# Altium PCB TCM_initial _Design.PcbDoc
Units mm, origin at the board's own origin, x right, y up, seen from the top; angles counter-clockwise.
Board outline 120.12 x 48.06 mm, 2 copper layers (Top Layer, Bottom Layer), stack 1.448 mm thick; 52 components, 52 nets, 170 pads, 43 vias.
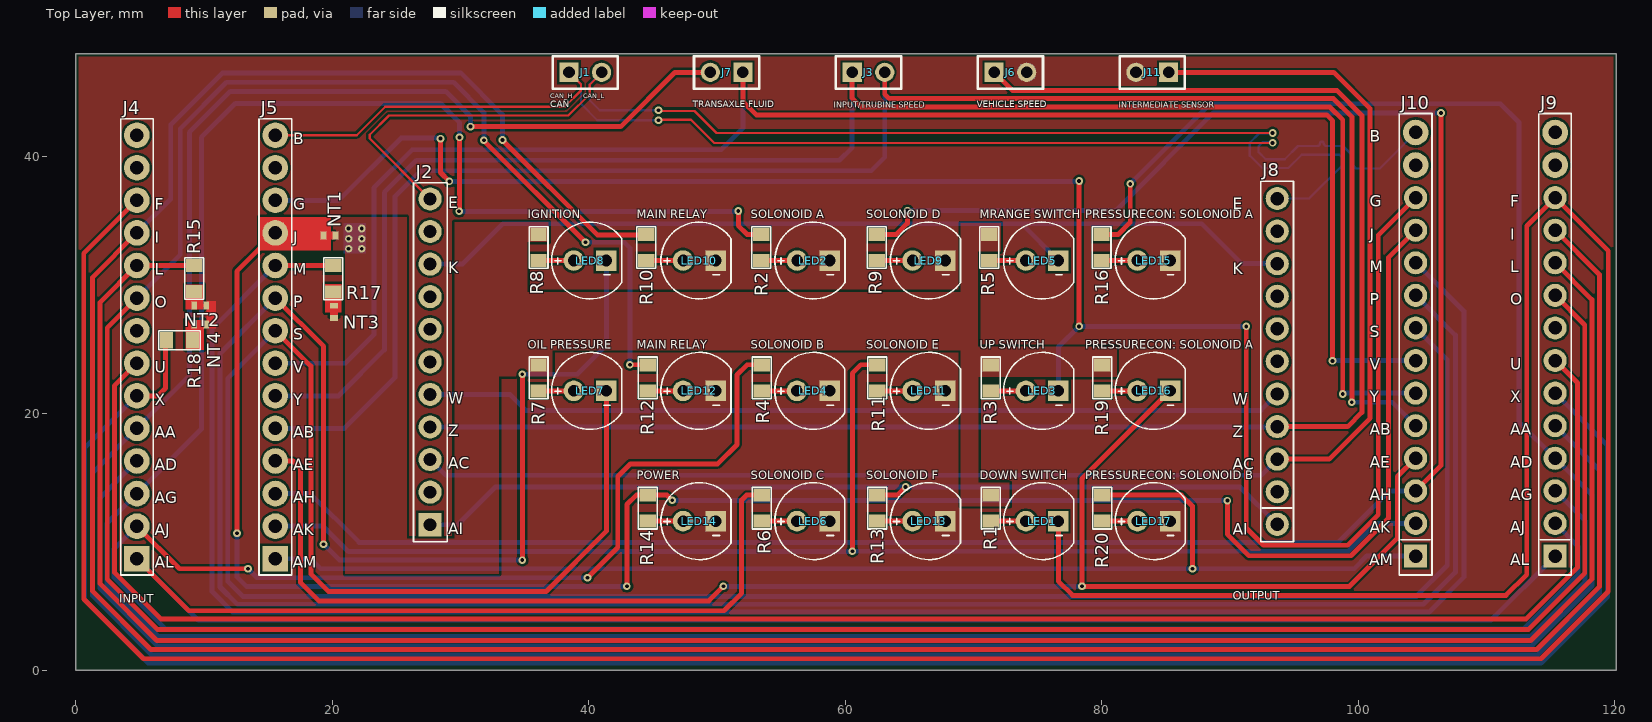
[diagram p0: Top Layer view]
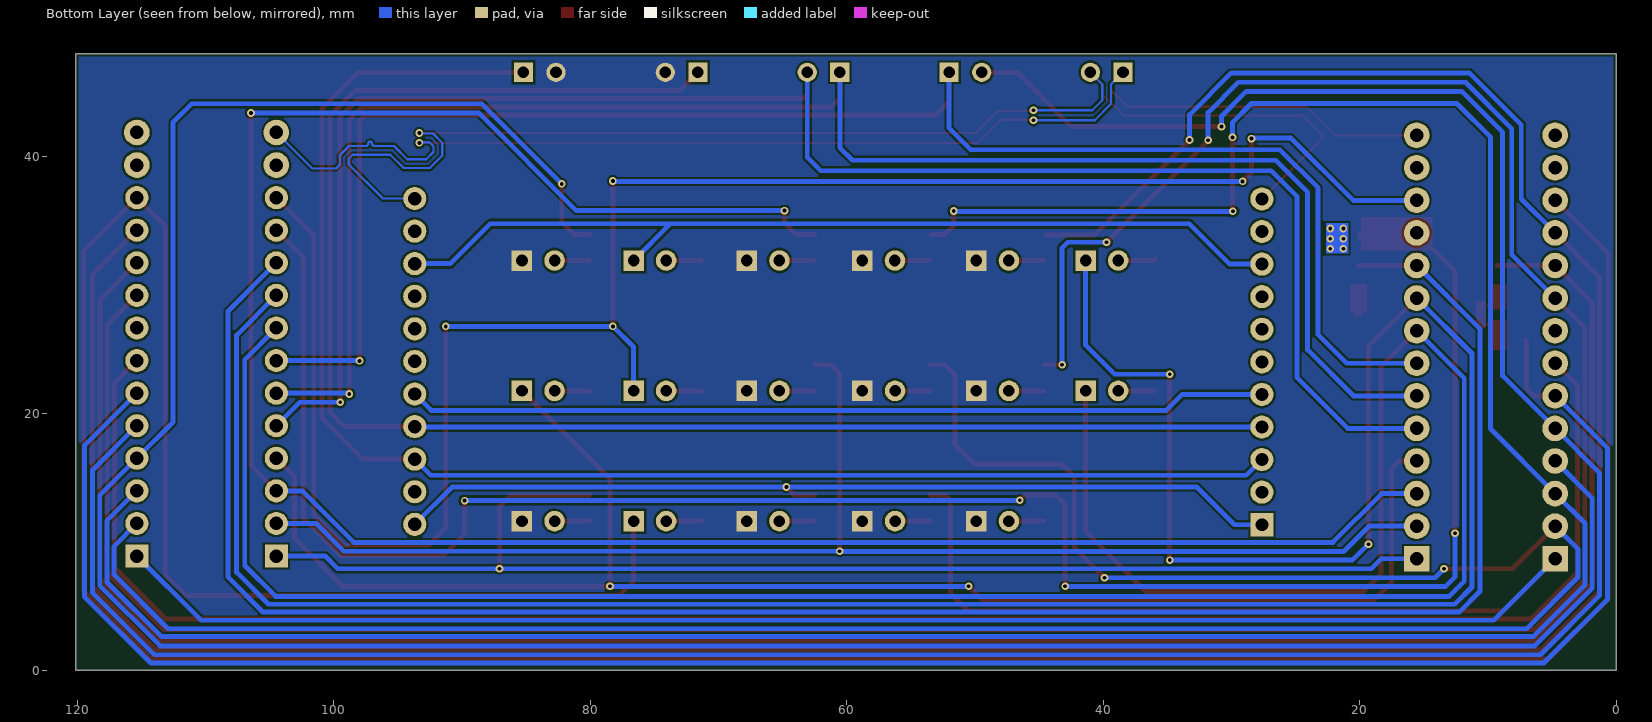
[diagram p1: Bottom Layer view, seen from below]
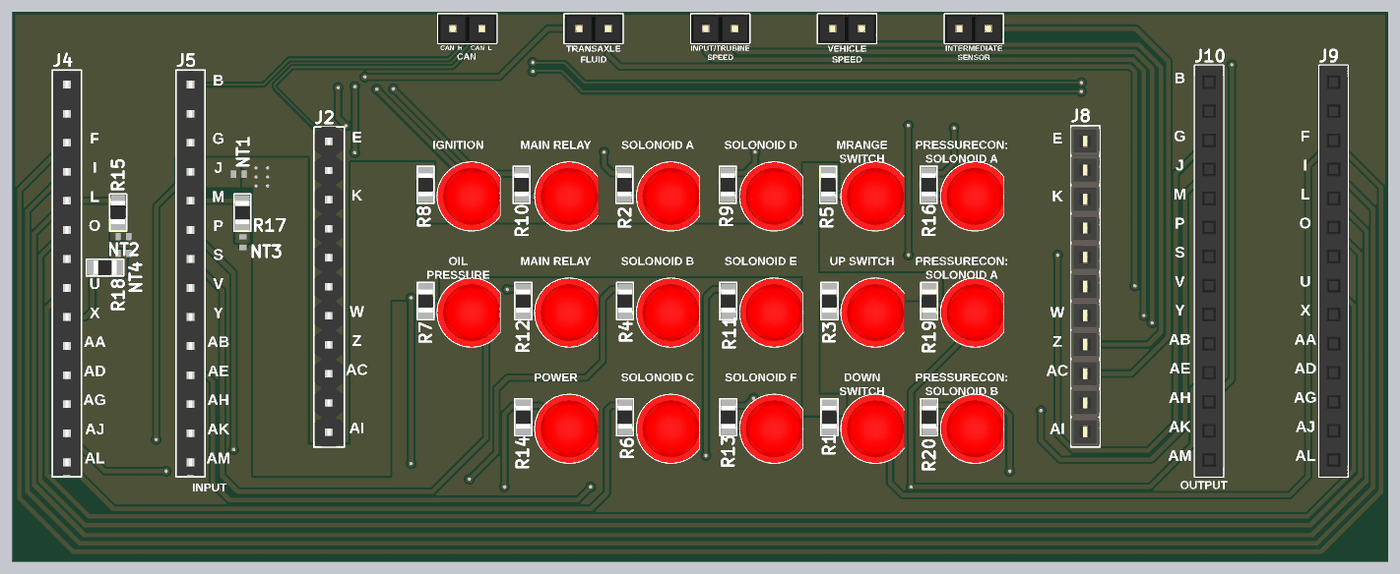
[diagram p2: 3D render of the assembled board from above, using the file's embedded part models]

## Layer stack, top to bottom
Top Solder: solder mask 0.0762, Solder Resist, Dk 3.5
Top Layer: signal copper 0.254
Dielectric 1: dielectric 0.9398, FR-4, Dk 4.8
Bottom Layer: signal copper 0.254
Bottom Solder: solder mask 0.0762, Solder Resist, Dk 3.5

## Board outline
0,0 0,48.057 120.117,48.057 120.117,0

## Design rules (kind name [scope] priority, off if disabled: settings)
BoardOutlineClearance [All] p1: gap=0 ignorepadtopadclearanceinfootprint=FALSE except(0.254: Poly-OutlineEdge)
Clearance [All] p1: gap=0.178 ignorepadtopadclearanceinfootprint=FALSE except(0: Arc-Hole Track-Hole SMDPad-Hole THPad-Hole Via-Hole Fill-Hole Poly-Hole Region-Hole Text-Hole; 0.102: Arc-SMDPad Track-SMDPad SMDPad-SMDPad)
DiffPairsRouting [InDifferentialPair('CAN')] p1: maxlimit=0.508 minlimit=0.508 mostfreqgap=0.508 toplayer_minwidth=0.178 toplayer_maxwidth=0.178 toplayer_prefwidth=0.178 bottomlayer_minwidth=0.178 bottomlayer_maxwidth=0.178 bottomlayer_prefwidth=0.178 impedanceprofiledriven=TRUE impedanceprofileid={E7D87EF9-33C4-4B85-B4AA-187234593E4B} impedanceprofilevalue=120.000000 maxuncoupledlength=12.7
HoleToHoleClearance [All] p1: gap=0 allowstackedmicrovias=TRUE
MaxMinImpedance "Schematic Impedance Constraint_1" [InDifferentialPairClass('CAN')] p1: minimum=117.0 maximum=123.0
MinimumSolderMaskSliver [All] p1: minsoldermaskwidth=0
PolygonConnect [All] p1: connectstyle=Direct reliefconductorwidth=0.254 reliefentries=4 polygonreliefangle="90 Angle" airgapwidth=0.254
RoutingVias [All] p1: holewidth=0.3 width=0.6 viastyle="Through Hole" minholewidth=0.3 minwidth=0.6 maxholewidth=0.3 maxwidth=0.6
SilkToSilkClearance [All] p1: silktosilkclearance=0
SilkToSolderMaskClearance [IsPad] p1: minsilkscreentomaskgap=0 clearancetoexposedcopper=TRUE
SolderMaskExpansion [All] p1: expansion=0.102 istentingtop=FALSE
Width [All] p1: maxlimit=1.016 minlimit=0.381 preferedwidth=0.559
25 further rules are at their usual default settings.

## Classes and differential pairs
differential pair class CAN: CAN
differential pair CAN: +CAN_P -CAN_N

## Components (designator, comment, footprint, x,y, rotation, side; value= is the part's Value field where it differs from the comment)
J1 "X6511WV-02H-C60D30" HDR1X2_ 38.464,46.598 r0 top locked
J2 "X6511WV-11H-C60D30" "HDR 1X11 male" 27.635,24.028 r90 top locked
J3 "X6511WV-02H-C60D30" HDR1X2_ 60.54,46.598 r0 top locked
J4 "X6511WV-14H-C60D30" "HDR 1x14 TH Male" 4.775,25.19 r90 top locked
J5 "X6511WV-14H-C60D30" "HDR 1x14 TH Male" 15.57,25.19 r90 top locked
J6 "X6511WV-02H-C60D30" HDR1X2_ 71.604,46.598 r0 top locked
J7 "X6511WV-02H-C60D30" HDR1X2_ 52.019,46.598 r180 top locked
J8 "X6511FV-11-C85D32" "HDR 1x11 TH (Female)" 93.675,24.061 r90 top locked
J9 "X6511FV-14-C85D32" "HDR 1x14 TH (Female)" 115.341,25.4 r90 top locked
J10 "X6511FV-14-C85D32" "HDR 1x14 TH (Female)" 104.47,25.4 r90 top locked
J11 "X6511WV-02H-C60D30" HDR1X2_ 85.208,46.598 r180 top locked
LED1 "NFD5408UGD" "TH LED 5mm Green" 75.349,11.608 r180 top locked
LED2 "NFD5408WC" "TH LED 5mm White" 57.51,31.928 r180 top locked
LED3 "NFD5408UGD" "TH LED 5mm Green" 75.349,21.768 r180 top locked
LED4 "NFD5408WC" "TH LED 5mm White" 57.506,21.768 r180 top locked
LED5 "NFD5408UGD" "TH LED 5mm Green" 75.349,31.928 r180 top locked
LED6 "NFD5408WC" "TH LED 5mm White" 57.506,11.608 r180 top locked
LED7 "NFD5408UYD" "TH LED 5mm Yellow" 40.107,21.768 r180 top locked
LED8 "NFD5408UYD" "TH LED 5mm Yellow" 40.107,31.928 r180 top locked
LED9 "NFD5408WC" "TH LED 5mm White" 66.516,31.928 r180 top locked
LED10 "NFD5408URD" "TH LED 5mm_" 48.624,31.928 r180 top locked
LED11 "NFD5408WC" "TH LED 5mm White" 66.516,21.768 r180 top locked
LED12 "NFD5408URD" "TH LED 5mm_" 48.624,21.768 r180 top locked
LED13 "NFD5408WC" "TH LED 5mm White" 66.516,11.608 r180 top locked
LED14 "NFD5408URD" "TH LED 5mm_" 48.624,11.608 r180 top locked
LED15 "NFD5408BC" "TH LED 5mm Blue" 84.049,31.928 r180 top locked
LED16 "NFD5408BC" "TH LED 5mm Blue" 84.049,21.768 r180 top locked
LED17 "NFD5408BC" "TH LED 5mm Blue" 84.049,11.608 r180 top locked
NT1 "Net Tie_SMD" "Net Tie Pad" 19.787,33.884 r180 top locked net-tie
NT2 "Net Tie_SMD" "Net Tie Pad" 9.716,28.423 r0 top locked net-tie
NT3 "Net Tie_SMD" "Net Tie Pad" 20.142,27.927 r270 top locked net-tie
NT4 "Net Tie_SMD" "Net Tie Pad" 9.716,26.949 r0 top locked net-tie
R1 "1K" RES-0805 71.336,12.624 r270 top locked value=1kR
R2 "1K" RES-0805 53.442,32.944 r270 top locked value=1kR
R3 "1K" RES-0805 71.336,22.784 r270 top locked value=1kR
R4 "1K" RES-0805 53.492,22.784 r270 top locked value=1kR
R5 "1K" RES-0805 71.222,32.944 r270 top locked value=1kR
R6 "1K" RES-0805 53.492,12.624 r270 top locked value=1kR
R7 "1K" RES-0805 36.093,22.784 r270 top locked value=1kR
R8 "1K" RES-0805 36.093,32.944 r270 top locked value=1kR
R9 "1K" RES-0805 62.459,32.944 r270 top locked value=1kR
R10 "1K" RES-0805 44.475,32.944 r270 top locked value=1kR
R11 "1K" RES-0805 62.503,22.784 r270 top locked value=1kR
R12 "1K" RES-0805 44.611,22.784 r270 top locked value=1kR
R13 "1K" RES-0805 62.503,12.624 r270 top locked value=1kR
R14 "1K" RES-0805 44.611,12.624 r270 top locked value=1kR
R15 "0R" Res-0805 9.252,30.524 r270 top locked
R16 "1K" RES-0805 79.985,32.944 r270 top locked value=1kR
R17 "0R" Res-0805 20.091,30.505 r270 top locked
R18 "0R" Res-0805 8.103,25.705 r0 top locked
R19 "1K" RES-0805 80.035,22.784 r270 top locked value=1kR
R20 "1K" RES-0805 80.035,12.624 r270 top locked value=1kR

## Footprints (in the part's own frame and the unit in brackets; to place one, negate y for a bottom-side part, rotate by r counter-clockwise, add the part's x,y. Pads: shape width x height; smd on the part's side, far side on the other; paste and mask are expansions set on the pad)
HDR1X2_ [mm] "CONN HEADER VERT 2POS 2.54MM"
  rect 1.5x1.5 hole 0.9: 1(0,0)
  round 1.5 hole 0.9: 2(2.54,0)
  silkscreen extent -1.27,-1.27 3.81,1.27, body extent -1.27,-1.27 3.81,1.27, height 8.44
"HDR 1X11 male" [mm]
  rect 1.8x1.8 hole 1: 1(-12.7,0)
  round 1.8 hole 1: 2(-10.16,0) 3(-7.62,0) 4(-5.08,0) 5(-2.54,0) 6(0,0) 7(2.54,0) 8(5.08,0) 9(7.62,0) 10(10.16,0) 11(12.7,0)
  silkscreen extent -14.02,-1.35 13.97,1.3, body extent -13.98,-1.25 13.97,1.25, height 8.5
"HDR 1x11 TH (Female)" [mm]
  round 1.8 hole 1.05 paste+0 mask+0.051: 1(-12.7,0) 2(-10.16,0) 3(-7.62,0) 4(-5.08,0) 5(-2.54,0) 6(0,0) 7(2.54,0) 8(5.08,0) 9(7.62,0) 10(10.16,0) 11(12.7,0)
  silkscreen extent -14.05,-1.27 14.05,1.27, body extent -13.97,-1.24 13.98,1.3, height 8.5
"HDR 1x14 TH (Female)" [mm]
  rect 1.8x1.8 hole 1.05 paste+0 mask+0.051: 1(-16.51,0)
  round 1.8 hole 1.05 paste+0 mask+0.051: 2(-13.97,0) 3(-11.43,0) 4(-8.89,0) 5(-6.35,0) 6(-3.81,0) 7(-1.27,0) 8(1.27,0) 9(3.81,0) 10(6.35,0) 11(8.89,0) 12(11.43,0)
  round 2 hole 1.05 paste+0 mask+0.051: 13(13.97,0) 14(16.51,0)
  silkscreen extent -17.99,-1.27 17.99,1.27, body extent -17.99,-1.25 17.98,1.25, height 8.8
"HDR 1x14 TH Male" [mm]
  rect 2x2 hole 1.05 paste+0 mask+0.051: 1(-16.51,0)
  round 2 hole 1.05 paste+0 mask+0.051: 2(-13.97,0) 3(-11.43,0) 4(-8.89,0) 5(-6.35,0) 6(-3.81,0) 7(-1.27,0) 8(1.27,0) 9(3.81,0) 10(6.35,0) 11(8.89,0) 12(11.43,0) 13(13.97,0) 14(16.51,0)
  silkscreen extent -17.78,-1.27 17.78,1.27, body extent -17.66,-1.18 17.65,1.18, height 10.72
"Net Tie Pad" [mil]
  rect 18x25 smd mask-10: 1(-18.5,0) 2(18.5,0)
  Top Layer region: -15,-12 15,-12 15,12 -15,12
RES-0805 [mil] "SMD 0805"
  rect 40x50 smd: 1(-40,0) 2(40,0)
  silkscreen extent -64,-29 64,29, body extent -39,-25 39,24, height 24
Res-0805 [mil] "SMD 0805"
  rect 40x50 smd: 1(-40,0) 2(40,0)
  silkscreen extent -64,-29 64,29, body extent -39,-25 39,24, height 24
"TH LED 5mm Blue" [mm]
  rect 1.6x1.6 hole 0.9: 1(-1.27,0)
  round 1.6 hole 0.9: 2(1.27,0)
  silkscreen extent -2.47,-3 3,3, body extent -2.5,-3 3,3, height 9.44
"TH LED 5mm Green" [mm]
  rect 1.6x1.6 hole 0.9: 1(-1.27,0)
  round 1.6 hole 0.9: 2(1.27,0)
  silkscreen extent -2.47,-3 3,3, body extent -2.5,-3 3,3, height 9.44
"TH LED 5mm White" [mm]
  rect 1.6x1.6 hole 0.9: 1(-1.27,0)
  round 1.6 hole 0.9: 2(1.27,0)
  silkscreen extent -2.47,-3 3,3, body extent -2.5,-3 3,3, height 9.44
"TH LED 5mm Yellow" [mm]
  rect 1.6x1.6 hole 0.9: 1(-1.27,0)
  round 1.6 hole 0.9: 2(1.27,0)
  silkscreen extent -2.47,-3 3,3, body extent -2.5,-3 3,3, height 9.44
"TH LED 5mm_" [mm]
  rect 1.6x1.6 hole 0.9: 1(-1.27,0)
  round 1.6 hole 0.9: 2(1.27,0)
  silkscreen extent -2.47,-3 3,3, body extent -2.5,-3 3,3, height 9.44

## Part data
J1 J3 J6 J7 J11: "Gold 250V 3A Straight Square Pins 2.5mm 2P 260℃ 6mm -40℃~+105℃ 3mm 2.54mm Plugin Black Brass 1x2P Plugin,P=2.54mm Pin Headers ROHS", LCSC Part Number=C706874, Manufacturer=XKB, Package=Plugin,P=2.54mm, ComponentLink1Description=LCSC, ComponentLink1URL=https://www.lcsc.com/product-detail/Pin-Headers_XKB-Connectivity-X6511WV-02H-C60D30_C706874.html, Item Type="Male Header", Manufacturer Part Number=X6511WV-02H-C60D30
J2: "Gold 250V 3A Policy 2.5mm 11P 260℃ -40℃~+105℃ 2.54mm Single Row Black Brass 1x11P 2.54mm Plugin,P=2.54mm Pin Headers ROHS", LCSC Part Number=C725943, Manufacturer=XKB, Package=Plugin,P=2.54mm, ComponentLink1Description=LCSC, ComponentLink1URL=https://www.lcsc.com/product-detail/Pin-Headers_XKB-Connection-X6511WV-11H-C60D30_C725943.html, Item Type="Male Header", Manufacturer Part Number=X6511WV-11H-C60D30
J4 J5: "Gold 250V 3A Policy 2.5mm 14P 260℃ -40℃~+105℃ 2.54mm Single Row Black Brass 2.54mm 1x14P Plugin,P=2.54mm Pin Headers ROHS", LCSC Part Number=C725946, Manufacturer=XKB, Package=Plugin,P=2.54mm, ComponentLink1Description=LCSC, ComponentLink1URL=https://www.lcsc.com/product-detail/Pin-Headers_XKB-Connection-X6511WV-14H-C60D30_C725946.html, Item Type="Male Header", Manufacturer Part Number=X6511WV-14H-C60D30
J8: "2.54mm Single Row Gold 3A 11P Brass -40℃~+105℃ 250V 260℃ Direct Insert 1x11P 8.5mm Top Square Hole Plugin,P=2.54mm Female Headers ROHS", LCSC Part Number=C2883728, Manufacturer="XKB Connectivity", ComponentLink1Description=LCSC, ComponentLink1URL=https://www.lcsc.com/product-detail/Female-Headers_XKB-Connection-X6511FV-11-C85D32_C2883728.html, Item Type="Female Header", Manufacturer Part Number=X6511FV-11-C85D32, RoHS=No, Supplier=LCSC
J9 J10: "2.54mm Single Row Gold 3A 14P Brass -40℃~+105℃ 250V 260℃ Direct Insert 1x14P 8.5mm Top Square Hole Plugin,P=2.54mm Female Headers ROHS", LCSC Part Number=C2883731, Manufacturer="XKB Connectivity", Item Type=Header, Manufacturer Part Number=X6511FV-14-C85D32
LED1 LED3 LED5: "515nm~525nm -30℃~+85℃ Emerald 30° 200mW Plugin,D=5mm LED Indication - Discrete ROHS", LCSC Part Number=C20618157, Manufacturer=Foshan, Package=Plugin,D=5mm, ComponentLink1Description=LCSC, ComponentLink1URL=https://www.lcsc.com/product-detail/LED-Indication-Discrete_Foshan-NationStar-Optoelectronics-NFD5408UGD_C20618157.html, Item Type=LED, Manufacturer Part Number=NFD5408UGD
LED2 LED4 LED6 LED9 LED11 LED13: "-30℃~+85℃ White 20° 200mW Plugin,D=5mm LED Indication - Discrete ROHS", LCSC Part Number=C20618159, Manufacturer=Foshan, Package=Plugin,D=5mm, ComponentLink1Description=LCSC, ComponentLink1URL=https://www.lcsc.com/product-detail/LED-Indication-Discrete_Foshan-NationStar-Optoelectronics-NFD5408WC_C20618159.html, Item Type=LED, Manufacturer Part Number=NFD5408WC
LED7 LED8: "585nm~595nm -30℃~+85℃ Yellow 30° 200mW Plugin,D=5mm LED Indication - Discrete ROHS", LCSC Part Number=C20618155, Manufacturer=Foshan, Package=Plugin,D=5mm, ComponentLink1Description=LCSC, ComponentLink1URL=https://www.lcsc.com/product-detail/LED-Indication-Discrete_Foshan-NationStar-Optoelectronics-NFD5408UYD_C20618155.html, Item Type=LED, Manufacturer Part Number=NFD5408UYD
LED10 LED12 LED14: "620nm~630nm -30℃~+85℃ Red 30° 200mW Plugin,D=5mm LED Indication - Discrete ROHS", LCSC Part Number=C20618154, Manufacturer=Foshan, Package=Plugin,D=5mm, ComponentLink1Description=LCSC, ComponentLink1URL=https://www.lcsc.com/product-detail/LED-Indication-Discrete_Foshan-NationStar-Optoelectronics-NFD5408URD_C20618154.html, Item Type=LED, Manufacturer Part Number=NFD5408URD
LED15 LED16 LED17: "460nm~470nm -30℃~+85℃ Blue 20° 200mW Plugin,D=5mm LED Indication - Discrete ROHS", LCSC Part Number=C20618158, Manufacturer=Foshan, Package=Plugin,D=5mm, ComponentLink1Description=LCSC, ComponentLink1URL=https://www.lcsc.com/product-detail/LED-Indication-Discrete_Foshan-NationStar-Optoelectronics-NFD5408BC_C20618158.html, Item Type=LED, Manufacturer Part Number=NFD5408BC
NT1 NT2 NT3 NT4: "Net Tie SMD", Manufacturer Part Number="Net Tie", Item Type="Net Tie Pad"
R1 R2 R3 R4 R5 R6 R7 R8 R9 R10 R11 R12 R13 R14 R16 R19 R20: library part RC0805FR-071KL, "RES 1K OHM 1% 1/8W 0805", Case Code (Imperial)=0805, Case Code (Metric)=2012, LCSC Part Number=C95781, Manufacturer=Yageo, Max Operating Temperature=155°C, Max Power Dissipation=125mW, Min Operating Temperature=-55°C, Package Quantity=1, Resistance Tolerance=1%, Resistor Type="Thick Film", Supplier Part Number=8126013, Temperature Coefficient=100ppm/°C, Voltage Rating=150V, Case/Package=0805, Category="Chip SMD Resistors", ComponentLink1Description=https://datasheet.ciiva.com/7941/1686128-7941719.pdf?src-supplier=Element14, ComponentLink1URL=https://datasheet.ciiva.com/7941/1686128-7941719.pdf?src-supplier=Element14, ComponentLink2Description=https://datasheet.ciiva.com/46385/444164-46385020.pdf?src-supplier=Element14, ComponentLink2URL=https://datasheet.ciiva.com/46385/444164-46385020.pdf?src-supplier=Element14, ComponentLink3Description=https://datasheet.ciiva.com/2456/pyu-r-int-thick-7-2456976.pdf?src-supplier=Digi-Key, ComponentLink3URL=https://datasheet.ciiva.com/2456/pyu-r-int-thick-7-2456976.pdf?src-supplier=Digi-Key, ComponentLink4Description=https://datasheet.ciiva.com/2456/pyu-r-int-thick-7-2456977.pdf?src-supplier=Digi-Key, ComponentLink4URL=https://datasheet.ciiva.com/2456/pyu-r-int-thick-7-2456977.pdf?src-supplier=Digi-Key, ComponentLink5Description=https://datasheet.ciiva.com/2456/pyu-r-int-thick-7-2456975.pdf?src-supplier=Digi-Key, ComponentLink5URL=https://datasheet.ciiva.com/2456/pyu-r-int-thick-7-2456975.pdf?src-supplier=Digi-Key, ComponentLink6Description=https://datasheet.ciiva.com/16850/rc0805-16850409.pdf?src-supplier=Future+Electronics, ComponentLink6URL=https://datasheet.ciiva.com/16850/rc0805-16850409.pdf?src-supplier=Future+Electronics, Construction=Rectangular, Depth=1.25mm, Features="Moisture Resistant", Height=0.024inch, Item Type=Resistor, Lead Free=5697LeadFree, Length=0.079inch, Manufacturer Part Number=RC0805FR-071KL, Military Standard=Not, Number of Terminations=2, Packaging="Tape and Reel", Pins=2, Power Rating=125mW, Pricing="5000=0.117, 25000=0.112, 125000=0.107, 500000=0.104, 1250000=0.0981 (USD)", Reach SVHC Compliant=No, RoHS=Yes, RoHS Compliant=Yes, Series=RC, Stock=8305000, Supplier="Future Electronics", Termination=SMD/SMT, Tolerance=1%, Voltage Rating (AC)=150V, Voltage Rating (DC)=150V, Width=0.049inch
R15 R17 R18: library part RC0805FR-070RL, "RES 0 OHM JUMPER 1/8W 0805", Case Code (Imperial)=0805, Case Code (Metric)=2012, LCSC Part Number=C100045, Manufacturer=Yageo, Max Operating Temperature=155°C, Max Power Dissipation=125mW, Min Operating Temperature=-55°C, Resistance=0mR, Resistor Type="Thick Film", Tolerance=1%, Case/Package=0805, Category="Chip SMD Resistors", ComponentLink1Description=https://datasheet.ciiva.com/15189/getdatasheetpartid-348154-15189885.pdf?src-supplier=Verical, ComponentLink1URL=https://datasheet.ciiva.com/15189/getdatasheetpartid-348154-15189885.pdf?src-supplier=Verical, ComponentLink2Description=https://datasheet.ciiva.com/17042/rc0805-17042698.pdf?src-supplier=Future+Electronics, ComponentLink2URL=https://datasheet.ciiva.com/17042/rc0805-17042698.pdf?src-supplier=Future+Electronics, Construction=Rectangular, Contact Plating=Tin,Matte, Depth=1.25mm, Features="Moisture Resistant", Item Type=Resistor, Lead Free="Lead Free", Length=2mm, Manufacturer Part Number=RC0805FR-070RL, Military Standard=Not, Number of Terminations=2, Packaging="Tape and Reel", Power Rating=125mW, Pricing 1="5000=0.00281, 10000=0.00277, 20000=0.00269 (USD)", Radiation Hardening=No, RoHS=Yes, RoHS Compliant=Yes, Series=RC, Size Code=0805, Stock 1=85000, Supplier 1=Avnet, Supplier Part Number 1=RC0805FR-070RL

## Via types
v1: diameter 0.6, hole 0.3, Top Layer to Bottom Layer, tented both sides, 43 vias

## Nets (pads, with @x,y where several pads share a name; then routed paths per layer and width w, separated by ;. In a path a pad name is that pad's centre, name@x,y a point inside that pad or via, vN(x,y) a via of type N, cw(c..) or ccw(c..) an arc to the next point about the centre after c; other vN are vias at no path point)
12V: NT1.1 R1.1 R3.1 R5.1 R7.1 R8.1 R19.1
  other v1: 21.285,32.842 22.301,32.842 21.285,33.63 22.301,33.63 21.285,34.417 22.301,34.417
AA: J4.5 J7.2 J9.5 | length 220.4
  Top Layer w0.381: v1(30.785,42.367) 42.494,42.367 46.725,46.598 J7.2
  Bottom Layer w0.381: v1(30.785,42.367) 30.785,43.18 28.854,45.11 12.057,45.11 8.865,41.918 8.865,22.929 J4.5 1.321,15.386 1.321,5.791 5.918,1.194 113.988,1.194 118.796,6.001 118.796,15.596 J9.5
AB: J3.2 J5.5 J10.5 | length 138
  Top Layer w0.381: J3.2 63.08,44.895 63.424,44.552 98.062,44.552 99.492,43.122 v1(99.492,20.879)
  Bottom Layer w0.381: J5.5 20.948,18.84 24.892,22.784 24.892,36.906 26.908,38.922 62.039,38.922 63.08,39.964 J3.2 ; v1(99.492,20.879) 102.641,20.879 J10.5
AC: J2.3 J8.3 J11.1 | length 116.6
  Top Layer w0.381: J11.1 98.08,46.598 100.914,43.764 100.914,19.634 97.721,16.441 J8.3
  Bottom Layer w0.381: J2.3 28.854,15.189 92.424,15.189 J8.3
AD: J4.4 J9.4 R16.1 | length 208.9
  Top Layer w0.381: R16.1 81.28,33.96 82.22,34.9 v1(82.22,37.905)
  Bottom Layer w0.381: J4.4 1.88,13.404 1.88,6.375 6.372,1.883 113.534,1.883 118.237,6.585 118.237,13.614 J9.4 112.522,19.329 112.522,42.697 111.074,44.145 88.46,44.145 v1(82.22,37.905)
AE: J5.4 J10.4 LED16.1 | length 124.1
  Top Layer w0.381: J5.4 16.949,16.3 17.526,15.723 17.526,6.833 18.96,5.398 49.366,5.398 v1(50.495,6.528) ; LED16.1 78.461,14.91 v1(78.461,6.528) 99.314,6.528 103.048,10.262 103.048,15.088 J10.4
  Bottom Layer w0.381: v1(50.495,6.528) v1(78.461,6.528)
AG: J4.3 J9.3 R2.1 | length 218.4
  Top Layer w0.381: v1(29.896,35.763) 29.921,35.789 v1(29.921,41.529) ; v1(51.664,35.789) 51.664,34.646 52.349,33.96 R2.1
  Bottom Layer w0.381: v1(29.896,35.763) 51.638,35.763 v1(51.664,35.789) ; v1(29.921,41.529) 29.921,42.697 28.448,44.171 12.446,44.171 9.804,41.529 9.804,18.789 J4.3 2.438,11.423 2.438,6.655 6.492,2.601 113.415,2.601 117.678,6.865 117.678,11.633 J9.3
AH: J5.3 J10.3 R9.1 | length 170.9
  Top Layer w0.381: R9.1 63.983,33.96 64.846,34.823 v1(64.846,35.814) ; J10.3 106.451,15.951 v1(106.451,43.434)
  Bottom Layer w0.381: J5.3 18.298,13.76 22.101,9.957 ; 22.149,9.957 41.46,9.957 70.002,9.957 98.425,9.957 102.438,13.97 J10.3 ; v1(64.846,35.814) 81.074,35.814 88.694,43.434 105.512,43.434 v1(106.451,43.434)
AI: J2.1 J8.1 R13.1 | length 70.9
  Top Layer w0.381: R13.1 64.071,13.64 v1(64.706,14.275)
  Bottom Layer w0.381: J2.1 29.769,11.328 32.715,14.275 60.3,14.275 90.761,14.275 J8.1
AJ: J4.2 J9.2 R4.1 | length 190.7
  Top Layer w0.381: J4.2 8.096,7.899 v1(13.437,7.899) ; v1(39.903,7.196) 42.266,9.558 42.266,15.088 43.256,16.078 50.063,16.078 51.562,17.577 51.562,23.012 52.349,23.8 R4.1
  Bottom Layer w0.381: J4.2 2.997,9.442 2.997,7.216 6.995,3.218 112.911,3.218 117.119,7.427 117.119,9.652 J9.2 ; v1(13.437,7.899) 14.14,7.196 39.844,7.196 v1(39.903,7.196)
AK: J5.2 J10.2 R11.1 | length 106.7
  Top Layer w0.381: v1(60.554,9.263) 60.554,23.139 61.214,23.8 R11.1
  Bottom Layer w0.381: J5.2 19.285,11.22 21.267,9.239 60.504,9.239 v1@60.554,9.289 ; v1(60.554,9.263) 87.006,9.263 99.211,9.263 101.378,11.43 J10.2
AL: J4.1 J9.1 R6.1 | length 173
  Top Layer w0.381: J4.1 8.832,4.623 50.546,4.623 51.918,5.994 51.918,13.259 52.299,13.64 R6.1
  Bottom Layer w0.381: J4.1 9.569,3.886 110.338,3.886 J9.1
AM: J5.1 J10.1 R20.1 | length 101.9
  Top Layer w0.381: R20.1 86.208,13.64 87.071,12.776 v1(87.071,7.899)
  Bottom Layer w0.381: J5.1 18.346,8.68 19.123,7.902 99.67,7.902 100.658,8.89 J10.1
CAN_N: J1.2 J2.11 J8.11 | length 102.4
  Top Layer w0.178: J2.11 22.922,41.442 22.922,41.728 24.425,43.232 38.41,43.232 40.077,44.898 40.077,45.624 41.004,46.551 J1.2 ; v1(45.441,43.637) 45.487,43.591 48.255,43.591 49.971,41.875 v1(93.32,41.875)
  Bottom Layer w0.178: J1.2 40.077,45.671 40.077,44.425 40.864,43.637 v1(45.441,43.637) ; v1(93.32,41.875) 93.274,41.829 92.249,41.829 91.535,41.115 91.535,40.105 92.506,39.134 94.539,39.134 95.581,40.175 98.511,40.175 98.824,39.863 98.824,39.421 96.164,36.761 J8.11
CAN_P: J1.1 J5.14 J10.14 | length 102.4
  Top Layer w0.178: J5.14 21.924,41.7 24.141,43.918 38.126,43.918 39.391,45.182 39.391,45.671 J1.1 ; v1(45.441,42.859) 45.487,42.905 47.971,42.905 49.779,41.097 v1(93.32,41.097)
  Bottom Layer w0.178: J1.1 39.391,45.671 39.391,44.141 40.672,42.859 v1(45.441,42.859) ; v1(93.32,41.097) 93.274,41.143 92.533,41.143 92.221,40.831 92.221,40.389 92.79,39.819 94.255,39.819 95.297,40.861 95.961,40.861 96.826,40.861 ccw(c96.826,41.039) 97.004,41.039 cw(c97.157,41.039) 97.309,41.039 ccw(c97.487,41.039) 97.487,40.861 97.88,40.861 98.795,40.861 99.51,40.147 99.51,39.421 99.822,39.108 101.668,39.108 J10.14
F: J4.12 J9.12 LED1.1 | length 260.8
  Top Layer w0.381: J4.12 0.635,32.48 0.635,5.537 5.292,0.88 114.24,0.88 119.482,6.121 119.482,32.69 J9.12 113.132,34.62 113.132,7.442 111.506,5.817 77.724,5.817 76.619,6.922 LED1.1
G: J5.12 J10.12 LED3.1 | length 151.2
  Top Layer w0.381: v1(28.448,41.427) 28.448,38.786 v1(29.134,38.1) ; v1(78.232,26.797) v1(78.232,38.125) ; v1(91.262,26.797) 91.262,11.074 92.608,9.728 99.162,9.728 101.549,12.116 101.549,33.909 J10.12
  Bottom Layer w0.381: J5.12 20.516,36.62 25.375,41.478 28.397,41.478 v1(28.448,41.427) ; v1(29.134,38.1) 78.207,38.1 v1(78.232,38.125) ; LED3.1 76.619,25.184 v1(78.232,26.797) v1(91.262,26.797)
GND: J6.2 J11.2 LED2.1 LED4.1 LED6.1 LED9.1 LED10.1 LED11.1 LED12.1 LED13.1 LED14.1 LED15.1 LED17.1 NT2.2 NT3.2 NT4.2
I: J4.11 J9.11 R10.1 | length 234.7
  Top Layer w0.381: J4.11 1.321,30.626 1.321,6.147 5.874,1.593 113.887,1.593 118.796,6.502 118.796,30.836 J9.11 ; v1(33.274,41.326) 40.691,33.909 44.425,33.909 R10.1
  Bottom Layer w0.381: J4.11 7.417,36.722 7.417,42.518 11.457,46.558 30.023,46.558 33.274,43.307 v1(33.274,41.326)
J: J5.11 J10.11 NT1.2 R14.1 | length 152.8
  Top Layer w0.381: v1(12.573,10.668) 12.573,31.083 J5.11 ; v1(42.977,6.528) 42.977,12.903 43.713,13.64 46.101,13.64 v1(46.507,13.233) ; v1(89.789,13.208) 89.789,10.592 91.465,8.915 99.426,8.915 102.362,11.851 102.362,32.182 J10.11
  Bottom Layer w0.381: v1(12.573,10.668) 12.573,7.264 13.31,6.528 v1(42.977,6.528) ; v1(46.507,13.233) 89.637,13.233 89.662,13.208 v1(89.789,13.208)
K: J2.9 J8.9 LED5.1 | length 72.7
  Bottom Layer w0.381: J2.9 30.15,31.648 33.299,34.798 73.749,34.798 ; LED5.1 73.749,34.798 ; J8.9 90.9,31.681 87.782,34.798 73.749,34.798
L: J4.10 J9.10 R15.1 | length 176.4
  Top Layer w0.381: R15.1 J4.10 1.905,28.67 1.905,6.731 6.329,2.307 113.432,2.307 118.212,7.087 118.212,28.88 J9.10
M: J5.10 J10.10 R17.1 | length 157.4
  Top Layer w0.381: J5.10 20.073,31.54 R17.1
  Bottom Layer w0.381: J5.10 10.643,26.612 10.643,6.121 12.243,4.521 105.512,4.521 108.229,7.239 108.229,27.991 J10.10
NetLED1_2: LED1.2 R1.2 | length 2.7
  Top Layer w0.381: R1.2 LED1.2
NetLED2_2: LED2.2 R2.2 | length 2.7
  Top Layer w0.381: R2.2@53.497,31.928 LED2.2
NetLED3_2: LED3.2 R3.2 | length 2.7
  Top Layer w0.381: R3.2 LED3.2
NetLED4_2: LED4.2 R4.2 | length 2.7
  Top Layer w0.381: R4.2 LED4.2
NetLED5_2: LED5.2 R5.2 | length 2.7
  Top Layer w0.381: R5.2@71.336,31.928 LED5.2
NetLED6_2: LED6.2 R6.2 | length 2.7
  Top Layer w0.381: R6.2 LED6.2
NetLED7_2: LED7.2 R7.2 | length 2.7
  Top Layer w0.381: R7.2 LED7.2
NetLED8_2: LED8.2 R8.2 | length 2.9
  Top Layer w0.381: R8.2@35.966,32.055 R8.2 LED8.2
NetLED9_2: LED9.2 R9.2 | length 2.7
  Top Layer w0.381: R9.2@62.503,31.928 LED9.2
NetLED10_2: LED10.2 R10.2 | length 2.7
  Top Layer w0.381: R10.2@44.611,31.928 LED10.2
NetLED11_2: LED11.2 R11.2 | length 2.7
  Top Layer w0.381: R11.2 LED11.2
NetLED12_2: LED12.2 R12.2 | length 2.7
  Top Layer w0.381: R12.2 LED12.2
NetLED13_2: LED13.2 R13.2 | length 2.7
  Top Layer w0.381: R13.2 LED13.2
NetLED14_2: LED14.2 R14.2 | length 2.7
  Top Layer w0.381: R14.2 LED14.2
NetLED15_2: LED15.2 R16.2 | length 2.7
  Top Layer w0.381: R16.2@80.035,31.928 LED15.2
NetLED16_2: LED16.2 R19.2 | length 2.7
  Top Layer w0.381: R19.2 LED16.2
NetLED17_2: LED17.2 R20.2 | length 2.7
  Top Layer w0.381: R20.2 LED17.2
NetNT2_1: NT2.1 R15.2
NetNT3_1: NT3.1 R17.2
NetNT4_1: NT4.1 R18.2
O: J4.9 J9.9 R12.1 | length 232.4
  Top Layer w0.381: J4.9 2.464,26.689 2.464,7.087 6.375,3.175 113.284,3.175 117.653,7.544 117.653,26.899 J9.9 ; v1(31.826,41.3) 31.826,41.275 v1(39.751,33.35) ; v1(43.205,23.8) R12.1
  Bottom Layer w0.381: J4.9 8.153,32.378 8.153,42.213 11.762,45.822 29.464,45.822 31.826,43.459 v1(31.826,41.3) ; v1(39.751,33.35) 42.774,33.35 43.205,32.918 v1(43.205,23.8)
P: J5.9 J10.9 LED8.1 | length 210.5
  Top Layer w0.381: J5.9 19.329,25.241 v1(19.329,9.804) ; v1(34.823,8.57) v1(34.823,23.063)
  Bottom Layer w0.381: J5.9 11.252,24.682 11.252,6.477 12.598,5.131 105.08,5.131 107.569,7.62 107.569,26.111 J10.9 ; v1(19.329,9.804) 20.549,8.585 34.798,8.585 34.823,8.611 v1(34.823,8.57) ; v1(34.823,23.063) 39.116,23.063 41.377,25.324 LED8.1
S: J5.8 J10.8 LED7.1 | length 193.8
  Top Layer w0.381: J5.8 18.339,23.691 18.339,7.493 19.72,6.112 36.668,6.112 41.377,10.82 LED7.1
  Bottom Layer w0.381: J5.8 11.862,22.752 11.862,6.909 13.03,5.74 104.521,5.74 106.934,8.153 106.934,24.206 J10.8
U: J4.7 J9.7 | length 151.1
  Top Layer w0.381: J4.7 3.023,22.167 3.023,7.618 6.67,3.971 113.064,3.971 117.094,8.001 117.094,22.377 J9.7
V: J5.7 J7.1 J10.7 | length 129.2
  Top Layer w0.381: J7.1 52.019,44.323 53.061,43.282 97.536,43.282 97.993,42.824 v1(97.993,24.105)
  Bottom Layer w0.381: J5.7 21.024,23.92 23.251,26.146 23.251,37.586 26.228,40.564 50.343,40.564 52.019,42.24 J7.1 ; v1(97.993,24.105) 98.019,24.13 J10.7
W: J2.5 J8.5 | length 67.1
  Bottom Layer w0.381: J2.5 33.858,21.488 35.103,20.244 92.398,20.244 J8.5
X: J4.6 J9.6 R18.1 | length 164.3
  Top Layer w0.381: J4.6 6.419,21.38 7.01,21.971 7.01,25.629 R18.1
  Bottom Layer w0.381: J4.6 0.686,17.291 0.686,5.512 5.65,0.547 114.256,0.547 119.431,5.722 119.431,17.501 J9.6
Y: J3.1 J5.6 J10.6 | length 134.1
  Top Layer w0.381: J3.1 60.54,44.59 61.239,43.891 97.789,43.891 98.781,42.899 v1(98.781,21.514)
  Bottom Layer w0.381: J5.6 20.491,21.38 24.071,24.96 24.071,37.246 26.568,39.743 59.555,39.743 60.54,40.728 J3.1 ; v1(98.781,21.514) 98.857,21.59 J10.6
Z: J2.4 J6.1 J8.4 | length 126.3
  Top Layer w0.381: J6.1 73.015,45.187 98.325,45.187 100.279,43.232 100.279,20.091 99.168,18.981 J8.4
  Bottom Layer w0.381: J2.4 93.643,18.948 J8.4
pads on no net: J2.2 J2.6 J2.7 J2.8 J2.10 J4.8 J4.13 J4.14 J5.13 J8.2 J8.6 J8.7 J8.8 J8.10 J9.8 J9.13 J9.14 J10.13

## Polygon pours and split planes (outlines as drawn)
12V on Top Layer "12V_L01_P000" (solid, remove dead copper, pour order 0): 37.16,24.943 37.16,22.911 32.995,22.911 32.995,7.493 21.031,7.493 21.031,32.727 19.914,32.727 19.914,35.318 25.806,35.318 25.806,10.236 29.54,10.236 29.54,34.925 36.855,34.925 36.855,33.376 35.204,33.376 35.204,29.464 69.469,29.464 69.469,24.943
GND on Top Layer "GND_L01_P002" (solid, remove dead copper, pour order 2): 0,0 0,48.057 120.117,48.057 120.117,0
12V on Top Layer "12V_L01_P001" (solid, remove dead copper, pour order 1): 72.111,33.274 72.111,32.639 70.333,32.639 70.333,25.197 81.153,25.197 81.153,22.86 70.383,22.86 70.383,14.605 72.796,14.605 72.796,12.776 69.012,12.776 69.012,34.823 72.111,34.823
GND on Bottom Layer "GND_L02_P003" (solid, remove dead copper, pour order 3): 0,0 0,48.057 120.117,48.057 120.117,0

## Other copper
Top Layer:
  region net J: 19.914,35.318 14.326,35.318 14.326,32.727 19.914,32.727
  rectangle net NetNT4_1: 8.56,24.968 10.008,27.28
  rectangle net GND: 10.185,26.619 10.947,28.753
  rectangle net NetNT2_1: 8.56,28.092 9.982,30.048
  rectangle net NetNT3_1: 19.456,27.864 20.726,30.099
Bottom Layer:
  rectangle net 12V: 20.879,32.461 22.657,34.849

## Silkscreen, mask and mechanical layers (free items; w line width, h text height)
Top Overlay:
  text "CAN_H" at 37.008,44.434 h0.64
  text "CAN_L" at 39.569,44.434 h0.64
  text "CAN" at 37.008,43.678 h0.89
  text "TRANSAXLE FLUID" at 48.108,43.678 h0.89
  text "INTERMEDIATE SENSOR" at 81.305,43.678 h0.76
  text "INPUT/TRUBINE SPEED" at 59.106,43.673 h0.76
  text "VEHICLE SPEED" at 70.235,43.674 h0.89
  text "B" at 100.889,40.875 h1.52
  text "B" at 16.967,40.665 h1.52
  text "G" at 100.889,35.795 h1.52
  text "F" at 111.836,35.795 h1.52
  text "E" at 29.058,35.694 h1.52
  text "E" at 90.195,35.618 h1.52
  text "F" at 6.172,35.585 h1.52
  text "G" at 16.967,35.585 h1.52
  text "IGNITION" at 35.232,34.972 h1.14
  text "MAIN RELAY" at 43.749,34.972 h1.14
  text "SOLONOID A" at 52.635,34.972 h1.14
  text "SOLONOID D" at 61.641,34.972 h1.14
  text "MRANGE SWITCH" at 70.474,34.972 h1.14
  text "PRESSURECON: SOLONOID A" at 78.723,34.972 h1.14
  text "J" at 100.889,33.255 h1.52
  text "I" at 111.836,33.255 h1.52
  text "I" at 6.172,33.045 h1.52
  text "J" at 16.967,33.045 h1.52
  text "M" at 100.889,30.715 h1.52
  text "L" at 111.836,30.715 h1.52
  text "K" at 29.058,30.614 h1.52
  text "K" at 90.195,30.538 h1.52
  text "L" at 6.172,30.505 h1.52
  text "M" at 16.967,30.505 h1.52
  text "P" at 100.889,28.175 h1.52
  text "O" at 111.836,28.162 h1.52
  text "P" at 16.967,27.965 h1.52
  text "O" at 6.172,27.952 h1.52
  text "S" at 100.889,25.635 h1.52
  text "S" at 16.967,25.425 h1.52
  text "OIL PRESSURE" at 35.232,24.808 h1.14
  text "MAIN RELAY" at 43.749,24.812 h1.14
  text "SOLONOID B" at 52.631,24.812 h1.14
  text "SOLONOID E" at 61.641,24.812 h1.14
  text "UP SWITCH" at 70.474,24.812 h1.14
  text "PRESSURECON: SOLONOID A" at 78.723,24.812 h1.14
  text "V" at 100.889,23.095 h1.52
  text "U" at 111.836,23.095 h1.52
  text "U" at 6.172,22.885 h1.52
  text "V" at 16.967,22.885 h1.52
  text "Y" at 100.889,20.555 h1.52
  text "X" at 111.836,20.555 h1.52
  text "W" at 29.058,20.454 h1.52
  text "W" at 90.195,20.378 h1.52
  text "X" at 6.172,20.345 h1.52
  text "Y" at 16.967,20.345 h1.52
  text "AB" at 100.889,18.015 h1.52
  text "AA" at 111.836,18.015 h1.52
  text "Z" at 29.058,17.914 h1.52
  text "Z" at 90.195,17.838 h1.52
  text "AA" at 6.172,17.805 h1.52
  text "AB" at 16.967,17.805 h1.52
  text "AE" at 100.889,15.475 h1.52
  text "AD" at 111.836,15.475 h1.52
  text "AC" at 29.058,15.374 h1.52
  text "AC" at 90.195,15.298 h1.52
  text "AD" at 6.172,15.265 h1.52
  text "AE" at 16.967,15.265 h1.52
  text "POWER" at 43.749,14.652 h1.14
  text "SOLONOID C" at 52.631,14.652 h1.14
  text "SOLONOID F" at 61.641,14.652 h1.14
  text "DOWN SWITCH" at 70.474,14.648 h1.14
  text "PRESSURECON: SOLONOID B" at 78.723,14.652 h1.14
  text "AH" at 100.889,12.935 h1.52
  text "AG" at 111.836,12.922 h1.52
  text "AH" at 16.967,12.725 h1.52
  text "AG" at 6.172,12.712 h1.52
  text "AK" at 100.885,10.395 h1.52
  text "AJ" at 111.836,10.395 h1.52
  text "AI" at 29.058,10.294 h1.52
  text "AI" at 90.195,10.218 h1.52
  text "AJ" at 6.172,10.185 h1.52
  text "AK" at 16.963,10.185 h1.52
  text "AM" at 100.856,7.855 h1.52
  text "AL" at 111.836,7.855 h1.52
  text "AL" at 6.172,7.645 h1.52
  text "AM" at 16.934,7.645 h1.52
  text "OUTPUT" at 90.195,5.236 h1.14
  text "INPUT" at 3.404,5.026 h1.14
Board_Outline:
  the board outline again, w0.127

## Dimensions
120.117,48.057 to 120.117,0 on Mechanical 1
0,48.057 to 120.117,48.057 on Mechanical 1